# Altium PCB SOM_PCB_BLUETECHNIX.PcbDoc (part 4 of 8)
Units mil, origin at the board's own origin, x right, y up, seen from the top; angles counter-clockwise.
Board outline 1225 x 1620 mil, 8 copper layers (Top Layer, Int1 (Sign), Int2 (GND), Int3 (Sign), Int4 (Sign), Int5 (PWR), Int6 (Sign), Bottom Layer), stack 66.2 mil thick; 65 components, 201 nets, 938 pads, 497 vias.
Unrouted connection lines stored in the file: 25.
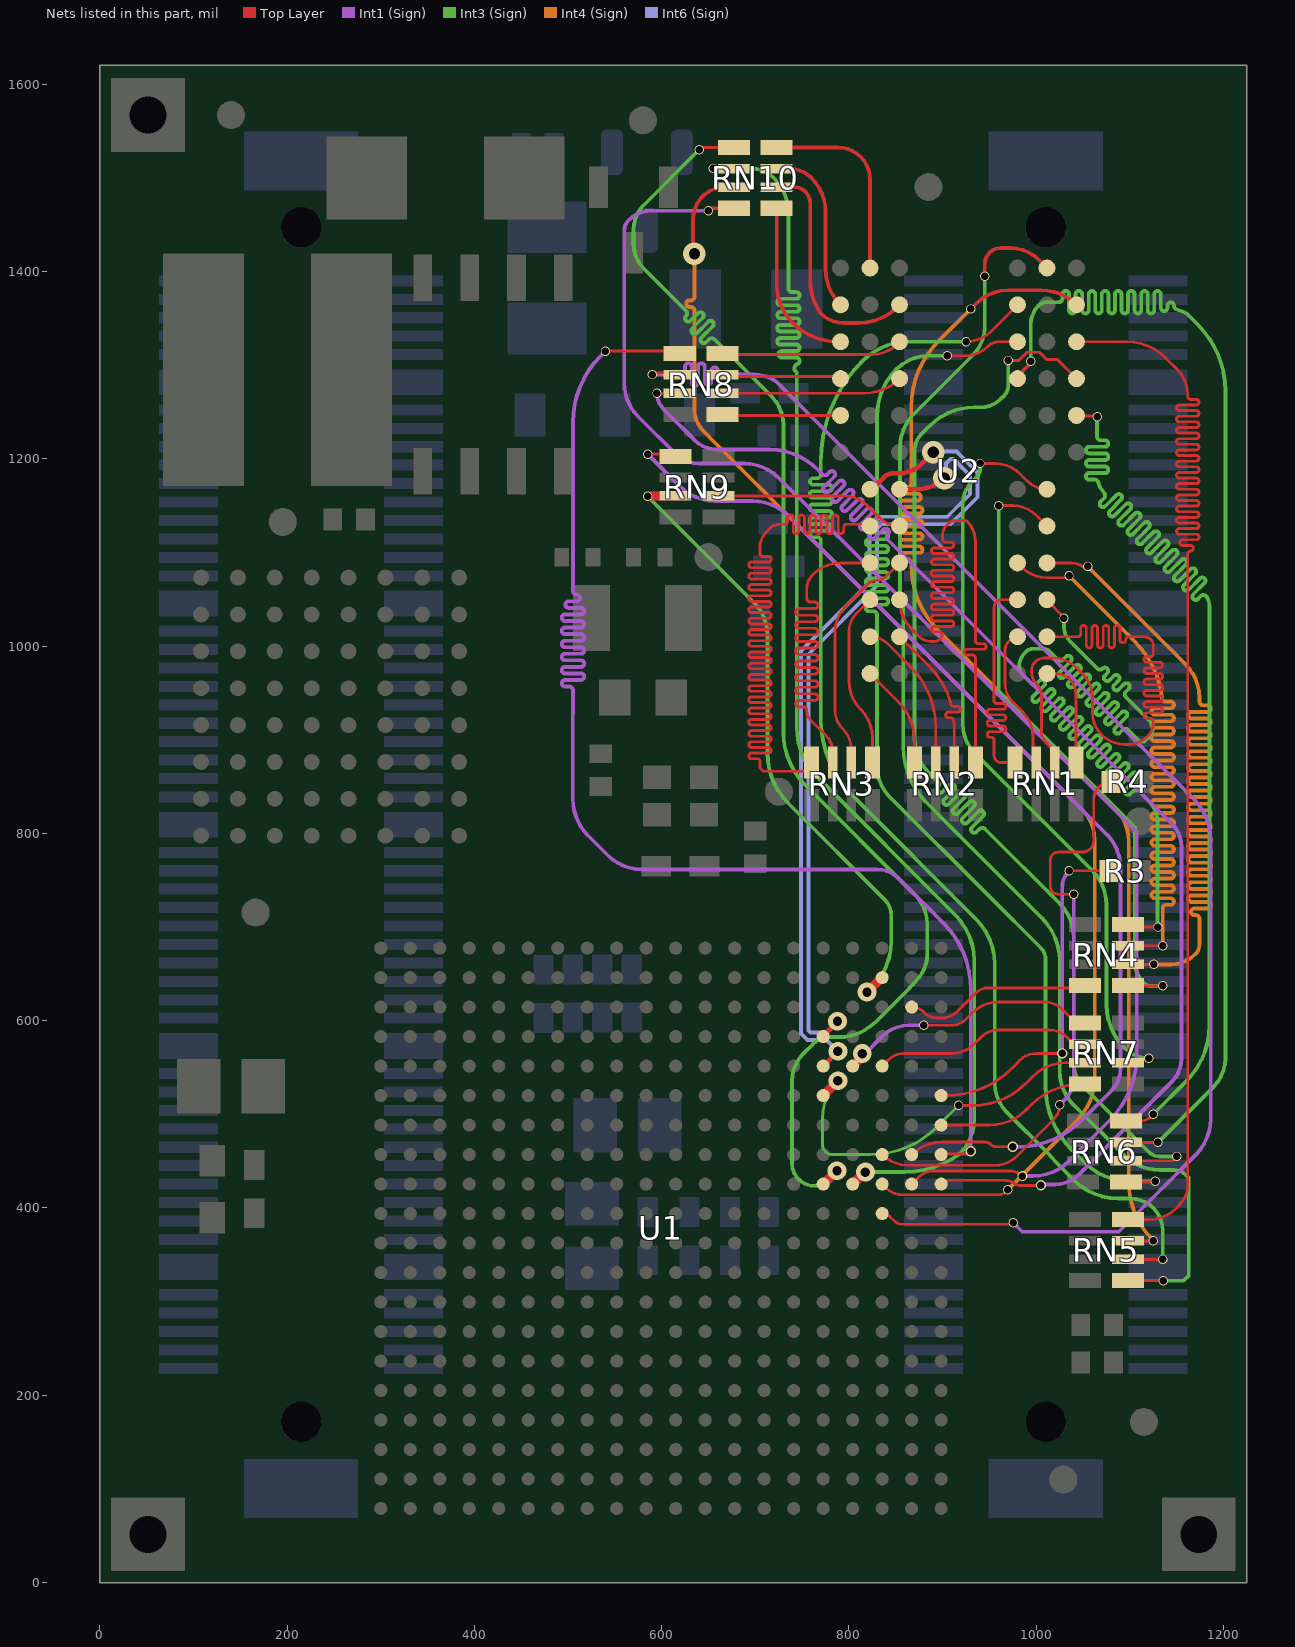
[diagram p9: the nets of this part, all layers, seen from the top]

## Via types
v1: diameter 20, hole 10, Top Layer to Int2 (GND), tented both sides, 68 vias
v2: diameter 10, hole 8, Top Layer to Int3 (Sign), tented both sides, 53 vias
v3: diameter 20, hole 10, Top Layer to Bottom Layer, tented both sides, 44 vias
v4: diameter 10, hole 8, Top Layer to Int1 (Sign), tented both sides, 41 vias
v5: diameter 20, hole 10, Top Layer to Int5 (PWR), tented both sides, 40 vias
v6: diameter 10, hole 8, Top Layer to Int4 (Sign), tented both sides, 33 vias
v7: diameter 20, hole 10, Top Layer to Int3 (Sign), tented both sides, 25 vias
v8: diameter 24, hole 12, Int6 (Sign) to Bottom Layer, tented both sides, 22 vias
v9: diameter 20, hole 10, Top Layer to Int4 (Sign), tented both sides, 19 vias
v10: diameter 24, hole 12, Int4 (Sign) to Bottom Layer, tented both sides, 17 vias
v11: diameter 24, hole 12, Int2 (GND) to Bottom Layer, tented both sides, 15 vias
v12: diameter 20, hole 10, Top Layer to Int1 (Sign), tented both sides, 13 vias
v13: diameter 24, hole 12, Top Layer to Int6 (Sign), tented both sides, 11 vias
v14: diameter 24, hole 12, Top Layer to Int4 (Sign), tented both sides, 10 vias
v15: diameter 24, hole 12, Top Layer to Int3 (Sign), tented both sides, 8 vias
v16: diameter 11, hole 8, Top Layer to Int1 (Sign), tented both sides, 8 vias
v17: diameter 10, hole 8, Top Layer to Bottom Layer, tented both sides, 7 vias
v18: diameter 20, hole 10, Top Layer to Int6 (Sign), tented both sides, 7 vias
v19: diameter 10, hole 8, Top Layer to Int6 (Sign), tented both sides, 6 vias
v20: diameter 10, hole 8, Int4 (Sign) to Bottom Layer, tented both sides, 6 vias
v21: diameter 24, hole 12, Int1 (Sign) to Bottom Layer, tented both sides, 5 vias
v22: diameter 24, hole 12, Top Layer to Int2 (GND), tented both sides, 5 vias
v23: diameter 10, hole 7, Top Layer to Int1 (Sign), tented both sides, 4 vias
v24: diameter 10, hole 8, Top Layer to Int2 (GND), tented both sides, 4 vias
v25: diameter 10, hole 8, Int2 (GND) to Bottom Layer, tented both sides, 4 vias
v26: diameter 24, hole 12, Int3 (Sign) to Bottom Layer, tented both sides, 4 vias
v27: diameter 24, hole 12, Top Layer to Bottom Layer, tented both sides, 4 vias
v28: diameter 10, hole 8, Int5 (PWR) to Bottom Layer, tented both sides, 3 vias
v29: diameter 20, hole 10, Int2 (GND) to Bottom Layer, tented both sides, 2 vias
v30: diameter 10, hole 8, Int6 (Sign) to Bottom Layer, tented both sides, 2 vias
v31: diameter 10, hole 8, Top Layer to Bottom Layer, 1 vias
v32: diameter 22, hole 12, Int2 (GND) to Bottom Layer, tented both sides, 1 vias
v33: diameter 24, hole 10, Int2 (GND) to Bottom Layer, tented both sides, 1 vias
v34: diameter 20, hole 12, Top Layer to Int5 (PWR), tented both sides, 1 vias
v35: diameter 20, hole 12, Top Layer to Int2 (GND), tented both sides, 1 vias
v36: diameter 24, hole 12, Top Layer to Int5 (PWR), tented both sides, 1 vias
v37: diameter 24, hole 12, Top Layer to Int1 (Sign), tented both sides, 1 vias

## Nets (pads, with @x,y where several pads share a name; then routed paths per layer and width w, separated by ;. In a path a pad name is that pad's centre, name@x,y a point inside that pad or via, vN(x,y) a via of type N, cw(c..) or ccw(c..) an arc to the next point about the centre after c; other vN are vias at no path point) (continued)
DDR_D9: RN8.3 U1.J20 | length 1586
  Top Layer w3: v4(595,1270) RN8.3@619.33,1270 ; U1.J20@898.46,425.51 cw(c908.09,415.88) 908.09,429.5 966.26,429.5 cw(c966.26,410.97) 978.28,425.08 ; 976.45,426.45 ccw(c982.18,432.18) 978.28,425.08 ; v16(1005,424.07) 982.18,424.07 cw(c982.18,432.18) 978.28,425.08
  Int1 (Sign) w4: v4(595,1270) ccw(c619.14,1270) 602.07,1252.93 635,1220 ccw(c659.14,1244.14) 654.71,1210.29 ccw(c659.14,1244.14) 659.14,1210 715,1210 cw(c715,1137.57) 733,1207.73 cw(c715,1137.57) 766.21,1188.79 770,1185 771.41,1183.59 ccw(c774.24,1186.41) 777.07,1183.59 779.32,1185.83 cw(c781.79,1183.36) 784.27,1185.83 cw(c781.79,1183.36) 784.27,1180.88 773.18,1169.8 ccw(c775.66,1167.32) 773.18,1164.85 ccw(c775.66,1167.32) 778.13,1164.85 789.22,1175.93 cw(c791.69,1173.46) 794.17,1175.93 cw(c791.69,1173.46) 794.17,1170.98 783.08,1159.9 ccw(c785.56,1157.42) 783.08,1154.95 ccw(c785.56,1157.42) 788.03,1154.95 799.12,1166.03 cw(c801.59,1163.56) 804.07,1166.03 cw(c801.59,1163.56) 804.07,1161.08 792.98,1150 ccw(c795.46,1147.52) 792.98,1145.05 ccw(c795.46,1147.52) 797.93,1145.05 809.02,1156.13 cw(c811.49,1153.66) 813.97,1156.13 cw(c811.49,1153.66) 813.97,1151.18 802.88,1140.1 ccw(c805.36,1137.62) 802.88,1135.15 ccw(c805.36,1137.62) 807.83,1135.15 818.92,1146.23 cw(c821.39,1143.76) 823.87,1146.23 cw(c821.39,1143.76) 823.87,1141.28 812.78,1130.2 ccw(c815.26,1127.72) 812.78,1125.25 ccw(c815.26,1127.72) 817.73,1125.25 828.82,1136.33 cw(c831.29,1133.86) 833.77,1136.33 cw(c831.29,1133.86) 833.77,1131.38 822.68,1120.3 ccw(c825.15,1117.82) 822.68,1115.35 ccw(c825.15,1117.82) 827.63,1115.35 836.68,1124.4 cw(c839.15,1121.92) 841.63,1124.4 cw(c839.15,1121.92) 841.63,1119.45 841.42,1119.24 ccw(c844.25,1116.41) 841.42,1113.58 850,1105 1145.31,809.69 cw(c1121.92,786.3) 1155,786.3 1155,772.6 1155,559.14 cw(c1120.86,559.14) 1145.02,535.02 1045.61,435.61 cw(c1020,461.21) 1020,425 1007.56,425 v16(1005,424.07)
DDR_D10: RN8.2 U1.K18 | length 1647.3
  Top Layer w3: v4@593.61,1291.72 617.3,1291.72 RN8.2@619.33,1289.68 ; U1.K18@835.47,394.02 cw(c835.47,381.94) 842.28,391.91 cw(c835.47,381.94) 844.01,390.48 847.99,386.5 ccw(c857.6,396.11) 857.6,382.52 973.38,382.52 974.36,382.95 v4(975.62,384.02)
  Int1 (Sign) w4: v4(590,1290) 611.72,1290 619.02,1290 621.02,1290 ccw(c621.02,1294) 625.02,1294 625.02,1298.5 cw(c628.52,1298.5) 632.02,1298.5 632.02,1281.5 ccw(c635.52,1281.5) 639.02,1281.5 639.02,1298.5 cw(c642.52,1298.5) 646.02,1298.5 646.02,1282.56 ccw(c649.52,1282.56) 653.02,1282.56 653.02,1294 cw(c656.52,1294) 660.02,1294 ccw(c664.02,1294) 664.02,1290 678.65,1290 680.65,1290 699.15,1290 cw(c699.14,1251.72) 708.87,1288.74 cw(c699.14,1251.72) 715,1286.56 cw(c699.14,1251.72) 726.18,1278.82 1167.93,837.07 cw(c1123.63,792.77) 1186.28,792.77 1186.28,495 cw(c1132.73,495) 1170.6,457.14 1129.23,415.77 ; v4(975.62,384.02) 985.08,374.56 1088.02,374.56 1129.21,415.75
DDR_D11: RN8.1 U1.H20 | length 1585.1
  Top Layer w3: v4(540,1315) 616.65,1315 RN8.1@619.33,1312.32 ; U1.H20@898.46,457.01 899.21,457.75 927.75,457.75 930,460 v16(930,460.5)
  Int1 (Sign) w4: 521.57,797.51 cw(c561.64,837.54) 505,837.54 505,928.18 505.31,928.49 505.31,950.78 505.31,952.78 ccw(c501.31,952.78) 501.31,956.78 496.81,956.78 cw(c496.81,960.28) 496.81,963.78 513.81,963.78 ccw(c513.81,967.28) 513.81,970.78 496.81,970.78 cw(c496.81,974.28) 496.81,977.78 513.81,977.78 ccw(c513.81,981.28) 513.81,984.78 496.81,984.78 cw(c496.81,988.28) 496.81,991.78 513.81,991.78 ccw(c513.81,995.28) 513.81,998.78 496.81,998.78 cw(c496.81,1002.28) 496.81,1005.78 513.81,1005.78 ccw(c513.81,1009.28) 513.81,1012.78 496.81,1012.78 cw(c496.81,1016.28) 496.81,1019.78 513.81,1019.78 ccw(c513.81,1023.28) 513.81,1026.78 496.81,1026.78 cw(c496.81,1030.28) 496.81,1033.78 513.81,1033.78 ccw(c513.81,1037.28) 513.81,1040.78 500.8,1040.78 cw(c500.8,1044.28) 500.8,1047.78 509.32,1047.78 ccw(c509.32,1051.28) 509.32,1054.78 cw(c509.31,1058.78) 505.31,1058.78 505.31,1073.31 505.31,1238.89 cw(c605.31,1238.89) 534.6,1309.6 v4(540,1315) ; 521.59,797.48 542.43,776.65 ccw(c578.99,813.21) 578.99,761.5 830.18,761.5 cw(c830.18,729.35) 852.92,752.08 900.71,704.29 cw(c830,633.58) 930,633.58 v16(930,460.5)
DDR_D12: RN10.4 U1.J19 | length 1592.4
  Top Layer w3: U1.J19@866.97,425.51 873.97,432.51 cw(c890.86,415.62) 890.86,439.51 958.93,439.51 971.72,439.5 cw(c971.72,420.72) 984.33,434.64 v16(985.24,434.07)
  Top Layer w4: 654.41,1467.52 RN10.4@677.17,1467.52
  Int1 (Sign) w4: v4(650,1465) 589.35,1465 ccw(c589.35,1430.35) 564.85,1454.85 ccw(c576.56,1443.14) 560,1443.14 560,1281.21 ccw(c611.21,1281.21) 574.99,1245.01 615,1205 ccw(c639.14,1229.14) 639.14,1195 687.83,1195 cw(c687.83,1142.46) 724.97,1179.63 725.02,1179.58 1067.48,841.42 1107.21,801.69 1107.21,558.78 cw(c1007.33,563.76) 1078.05,493.05 1035,450 cw(c996.37,488.63) 996.37,434 v16(985.24,434.07)
DDR_D13: RN10.3 U1.J18 | length 1460.3
  Top Layer w3: RN10.3@667.95,1490.16 RN10.3@677.17,1490.16 ; U1.J18@835.47,425.51 U1.J18@839.79,421.19 ; U1.J18@839.82,421.16 ccw(c856.9,438.26) 856.9,414.09 862.13,414.09 862.2,414.01 871.73,414.01 871.81,414.09 893.62,414.09 893.7,414.01 959.43,414.01 ccw(c959.43,425.07) 962.68,414.5 ccw(c959.43,425.07) 967.24,417.24 v6(969.72,419.31)
  Top Layer w4: v14(635,1419.06) 633.59,1420.47 633.59,1451.41 633.59,1455.83 cw(c667.92,1455.82) RN10.3@667.91,1490.16
  Int4 (Sign) w4: v14(635,1419.06) 635,1387.49 635,1373.11 cw(c631,1373.11) 631,1369.11 629.67,1369.11 ccw(c629.67,1365.61) 629.67,1362.11 631,1362.11 cw(c631,1358.11) 635,1358.11 635,1356.11 635,1253.18 ccw(c668.56,1253.18) 644.81,1229.47 ; 644.83,1229.45 1048.87,825.41 cw(c1015.96,792.5) 1062.5,792.5 1062.5,539.4 cw(c997.55,539.4) 1043.48,493.48 970.85,420.85 v6(969.72,419.31)
DDR_D14: RN10.2 U1.J17 | length 1555.7
  Top Layer w3: v2(655,1510) 677.01,1510 RN10.2@677.17,1509.84
  Top Layer w10: U1.J17@803.98,425.51 804.38,425.51 817.17,438.3 v7(817.57,438.3)
  Int3 (Sign) w4: v2(655,1510) 695.54,1510 cw(c695.54,1475.86) 719.68,1500 cw(c681.86,1462.18) 735.35,1462.18 735.35,1383.99 735.35,1381.99 ccw(c739.35,1381.99) 739.35,1377.99 743.85,1377.99 cw(c743.85,1374.49) 743.85,1370.99 726.85,1370.99 ccw(c726.85,1367.49) 726.85,1363.99 743.85,1363.99 cw(c743.85,1360.49) 743.85,1356.99 726.85,1356.99 ccw(c726.85,1353.49) 726.85,1349.99 743.85,1349.99 cw(c743.85,1346.49) 743.85,1342.99 726.85,1342.99 ccw(c726.85,1339.49) 726.85,1335.99 743.85,1335.99 cw(c743.85,1332.49) 743.85,1328.99 726.85,1328.99 ccw(c726.85,1325.49) 726.85,1321.99 743.85,1321.99 cw(c743.85,1318.49) 743.85,1314.99 728.26,1314.99 ccw(c728.26,1311.49) 728.26,1307.99 743.85,1307.99 cw(c743.85,1304.49) 743.85,1300.99 ccw(c747.74,1296.46) 742.3,1293.99 744.24,1292.05 744.24,1280.79 744.24,913.22 ccw(c819.45,913.22) 766.25,860.06 913.54,712.77 cw(c864.76,663.98) 933.75,663.98 933.75,494.84 cw(c881.3,494.84) 918.39,457.75 cw(c859.13,538.3) 859.13,438.3 v7(817.57,438.3)
DDR_D15: RN10.1 U1.J16 | length 1525.5
  Top Layer w3: v2(640,1530) 642.48,1532.48 RN10.1@677.17,1532.48
  Top Layer w10: U1.J16@772.48,425.51 772.72,425.51 786.97,439.76 v7(787.21,439.76)
  Int3 (Sign) w4: 580.76,1470.76 ccw(c606.82,1444.75) 570,1444.75 570,1429.5 ccw(c607.38,1429.5) 580.95,1403.07 608.4,1375.61 625.95,1358.06 cw(c623.13,1355.23) 625.95,1352.4 ccw(c628.43,1349.93) 625.95,1347.45 ccw(c628.43,1349.93) 630.9,1347.45 638.96,1355.51 cw(c641.43,1353.03) 643.91,1355.51 cw(c641.43,1353.03) 643.91,1350.56 632.67,1339.32 ccw(c635.15,1336.85) 632.67,1334.37 ccw(c635.15,1336.85) 637.62,1334.37 649.64,1346.39 cw(c652.12,1343.92) 654.59,1346.39 cw(c652.12,1343.92) 654.59,1341.44 642.57,1329.42 ccw(c645.05,1326.95) 642.57,1324.47 ccw(c645.05,1326.95) 647.52,1324.47 650.7,1327.66 cw(c653.53,1324.83) 656.36,1327.66 657.77,1326.24 717.28,1266.74 ; 580.78,1470.78 v2(640,1530) ; 717.3,1266.72 cw(c686.56,1236.02) 730,1236.02 730,907.74 ccw(c809.04,907.74) 753.11,851.89 ; 753.15,851.85 870.67,734.33 cw(c839.34,703) 883.65,703 883.65,671.33 cw(c843.43,671.33) 880.39,655.47 cw(c843.43,671.33) 871.87,642.89 cw(c793.57,705.1) 864.29,634.39 829.11,599.21 cw(c788.14,640.18) 795.14,582.67 780.35,582.67 ccw(c780.35,556.04) 761.52,574.87 751.05,564.4 ccw(c779.7,535.75) 739.19,535.75 739.19,447.41 ccw(c762.89,447.41) 746.06,430.71 746.1,430.67 ccw(c763.69,448.18) 759.4,423.74 762.11,423.74 ccw(c762.11,445.08) 777.2,429.99 ccw(c759.4,452.21) 779.52,432.06 ; 779.53,432.08 v7(787.21,439.76)
DDR_D\C\A\S\: RN7.3 U1.F16 | length 412.2
  Top Layer w3: v2(917,509.5) 932.82,509.5 ccw(c932.82,588.07) 988.37,532.51 996.31,540.45 cw(c1031.43,505.33) 1031.43,555 1052.01,555 RN7.3@1052.17,555.16
  Top Layer w10: U1.F16@772.48,520 v7(788.23,535.75)
  Int3 (Sign) w3: v7(788.23,535.75) ccw(c828.06,495.91) 771.73,495.91 771.73,467.96 ccw(c783.05,467.96) 775.04,459.96 ccw(c783.05,467.96) 780.35,456.97 823.05,456.97 ccw(c823.05,556.97) 893.76,486.26 v2(917,509.5)
DDR_D\C\L\K\E\: RN9.3 U1.B18 | length 691.4
  Top Layer w10: v2(585,1160) 585.31,1160.32 RN9.3@615,1160.32 ; v7(819.29,630.5) 819.64,630.5 835.12,645.98 U1.B18@835.47,645.98
  Int3 (Sign) w4: v2(585,1160) 698.68,1046.32 cw(c664.1,1011.74) 713.01,1011.74 713.01,885.74 ccw(c788.9,885.74) 735.24,832.07 838.4,728.91 cw(c822.26,712.77) 845.09,712.77 845.09,684.53 cw(c776.92,684.53) 825.12,636.34 v7(819.29,630.5)
DDR_D\C\S\0\: RN4.4 U1.C19 | length 201
  Top Layer w3: U1.C19@866.97,614.49 cw(c866.97,595.93) 875.27,612.53 cw(c866.97,595.93) 880.07,609.07 ; 880.09,609.05 881.42,607.72 ; 881.43,607.71 ccw(c892.85,619.14) 892.85,602.99 899.54,602.99 ccw(c899.54,625.46) 915.41,609.56 ; 915.43,609.57 935.43,629.57 ; 935.44,629.58 cw(c948.54,616.46) 948.54,635 1049.65,635 RN4.4@1052.17,637.52
DDR_D\R\A\S\: RN7.1 U1.E17 | length 269.5
  Top Layer w3: v4(880,595) 910,595 ccw(c910,614.75) 923.95,600.77 ; 923.96,600.78 931.28,608.11 cw(c960,579.39) 960,620 1008.71,620 cw(c1008.71,592.77) 1027.96,612.03 1035.94,604.05 1036.54,604.05 1040,600.6 RN7.1@1040,599.99
  Top Layer w10: U1.E17@803.98,551.5 814.09,561.61 v12(814.09,564.82)
  Int1 (Sign) w4: v12(814.09,564.82) 817.3,564.82 817.39,564.91 835.98,583.5 cw(c863.74,555.75) 863.74,595 v4(880,595)
DDR_D\W\R\: RN7.2 U1.E18 | length 234.3
  Top Layer w3: U1.E18@835.47,551.5 842.23,558.25 cw(c858.53,541.95) 858.53,565 910,565 ccw(c910,597.69) 933.09,574.55 940.82,582.29 ; 940.84,582.3 cw(c959.44,563.67) 959.44,590 1014.28,590 cw(c1014.28,564.12) 1032.56,582.44 ; 1032.58,582.42 1040.16,574.84 RN7.2@1052.17,574.84
DDR_DCLK0_N: U1.E16 U2.G3 | length 893.5
  Top Layer w5: U1.E16@772.48,551.5 v18(788.23,567.24) ; U2.G3@854.02,1167.52 872.96,1167.52 ccw(c872.96,1207.98) 878.67,1167.93 ccw(c872.96,1207.98) 901.57,1179.37 v13@907.39,1173.55
  Int6 (Sign) w4: v18(788.23,567.24) 788.04,567.24 776.04,579.24 755.76,579.24 748.73,586.27 748.73,994.62 822,1067.88 822,1128.61 831.39,1138 905,1138 929.17,1162.17 929.17,1182.06 911.51,1199.72 908.2,1199.72 903.52,1195.04 903.52,1181.33 v13(901.65,1179.46)
DDR_DCLK0_P: U1.D16 U2.G2 | length 911.8
  Top Layer w5: U1.D16@772.48,582.99 772.48,583.34 786.76,597.62 v18(787.84,599.24) ; U2.G2@822.52,1167.52 824.55,1167.52 836.98,1179.96 cw(c848.03,1168.91) 848.03,1184.53 854.5,1184.53 ccw(c854.5,1215.58) 876.45,1193.63 889.76,1206.93 v13(890.12,1206.93)
  Int6 (Sign) w4: v18(787.84,599.24) 787.84,599.05 776.04,587.24 759.08,587.24 756.73,589.59 756.73,991.3 830,1064.57 830,1125.29 834.71,1130 908.31,1130 937.17,1158.85 937.17,1185.37 914.83,1207.72 890.9,1207.72 v13(890.12,1206.93)
DDR_DQM0: RN7.4 U1.G20 | length 164.3
  Top Layer w3: U1.G20@898.46,488.5 908.36,488.5 ; 909.24,488.38 ccw(c908.38,485.5) 908.41,488.5 950.53,488.5 ccw(c950.53,542.53) 988.74,504.33 993.9,509.49 cw(c1049.4,453.99) 1026.15,528.96 cw(c1049.4,453.99) RN7.4@1049.4,532.48
DDR_DQM1: RN9.1 U1.H19 | length 1204.1
  Top Layer w3: v4(585,1205) 612.64,1205 RN9.1@615,1202.64 ; U1.H19@866.97,457.01 cw(c899.54,424.43) 899.54,470.5 944.78,470.5 cw(c944.78,461.11) 951.42,467.75 ccw(c957.02,473.35) 957.02,465.43 v16(975,465.43)
  Int1 (Sign) w4: v4(585,1205) 619.13,1170.87 ccw(c657.52,1209.27) 657.52,1154.97 696.42,1154.97 cw(c696.42,1099.72) 735.49,1138.79 1075.36,798.91 cw(c1040.03,763.58) 1090,763.58 1090,549.14 cw(c1055.86,549.14) 1080.02,525.02 1049.29,494.29 cw(c978.58,565) 1010.12,470.1 cw(c978.58,565) 978.58,465 978.15,465.43 v16(975,465.43)
DDR_DQS0: R3.1 U1.F20 | length 382.1
  Top Layer w3: U1.F20@898.46,520 903.61,520 ccw(c903.61,620) 922.74,521.85 ccw(c903.61,620) 974.32,549.29 980,554.96 cw(c1000.14,539.92) 982.36,557.69 cw(c1000,540.06) 1000,565 v16(1027.74,565) ; v4(1035,760) R3.1@1077.48,760
  Int1 (Sign) w4: v16(1027.74,565) 1027.74,742.48 cw(c1052.52,742.48) v4(1035,760)
DDR_DQS1: R4.1 U1.H18 | length 641.6
  Top Layer w3: U1.H18@835.47,457.01 ccw(c863.24,484.77) 862.19,445.52 ccw(c863.24,484.77) 863.24,445.51 955.62,445.51 ccw(c955.62,479.38) 979.57,455.43 1018.54,494.39 ccw(c1002.93,510) v4(1025,510) ; v4(1040,735) 1023.54,735 cw(c1023.54,743.54) 1017.51,737.49 cw(c1023.54,743.54) 1015,743.54 1015,771.46 cw(c1023.54,771.46) 1017.49,777.49 cw(c1023.54,771.46) 1023.54,780 1049.4,780 ccw(c1049.4,791.97) 1061.37,791.97 1061.37,836.41 cw(c1079.96,836.41) R4.1@1079.96,855
  Int1 (Sign) w4: v4(1025,510) 1030.25,515.25 ccw(c1006.71,538.79) 1040,538.79 v4(1040,735)
DDR_RES_A0: RN1.8 U2.K7 | length 316.7
  Top Layer w3: 957.15,877.85 cw(c962.39,883.06) 955,883.06 955,898.09 955,899.59 ccw(c952,899.59) 952,902.59 950.6,902.59 cw(c950.6,905.59) 950.6,908.59 964.6,908.59 ccw(c964.6,911.59) 964.6,914.59 950.6,914.59 cw(c950.6,917.59) 950.6,920.59 964.6,920.59 ccw(c964.6,923.59) 964.6,926.59 950.6,926.59 cw(c950.6,929.59) 950.6,932.59 964.6,932.59 ccw(c964.6,935.59) 964.6,938.59 958,938.59 cw(c958,941.59) 955,941.59 955,946.28 955,1041.88 cw(c962.53,1041.88) 957.2,1047.2 cw(c962.53,1041.88) 962.53,1049.41 U2.K7@980,1049.41 ; 957.18,877.82 ccw(c962.39,883.06) 962.39,875.67 RN1.8@977.36,875.67
DDR_RES_A1: RN1.6 U2.L8 | length 861.4
  Top Layer w3: 998.92,983.19 ccw(c1008.43,973.71) 995,973.71 995,972.42 ccw(c1012.92,972.42) 1000.25,959.75 cw(c987.58,947.08) 1005.5,947.08 1005.5,909.92 ccw(c1024.95,909.92) 1011.19,896.17 cw(c990.7,875.67) RN1.6@1019.68,875.67 ; 998.94,983.22 cw(c1008.43,973.71) 1008.43,987.14 1017.86,987.14 cw(c1017.86,950.92) 1043.45,976.55 1049.09,970.91 cw(c1022.75,944.57) 1060,944.57 1060,929.14 ccw(c1094.14,929.14) 1069.98,905.02 ccw(c1094.14,929.14) 1094.14,895 1097.84,895 ccw(c1097.84,925.17) 1109.21,897.22 ccw(c1097.84,925.17) 1119.18,903.84 ccw(c1105.12,917.89) 1125,917.89 1125,918.2 1125,919.7 ccw(c1122,919.7) 1122,922.7 1118,922.7 cw(c1118,925.7) 1118,928.7 1132,928.7 ccw(c1132,931.7) 1132,934.7 1118,934.7 cw(c1118,937.7) 1118,940.7 1132,940.7 ccw(c1132,943.7) 1132,946.7 1118,946.7 cw(c1118,949.7) 1118,952.7 1132,952.7 ccw(c1132,955.7) 1132,958.7 1118,958.7 cw(c1118,961.7) 1118,964.7 1132,964.7 ccw(c1132,967.7) 1132,970.7 1118,970.7 cw(c1118,973.7) 1118,976.7 1132,976.7 ccw(c1132,979.7) 1132,982.7 1118,982.7 cw(c1118,985.7) 1118,988.7 1122,988.7 ccw(c1122,991.7) 1125,991.7 1125,996.51 1125,1000.75 ccw(c1116.01,1000.75) 1116.01,1009.74 ccw(c1113.4,998.44) 1113.4,1010.04 1112.8,1010.04 1098.49,1010.04 ccw(c1098.49,1007.04) 1095.49,1007.04 1095.49,1006.51 cw(c1092.49,1006.51) 1089.49,1006.51 1089.49,1019.04 ccw(c1086.49,1019.04) 1083.49,1019.04 1083.49,1001.04 cw(c1080.49,1001.04) 1077.49,1001.04 1077.49,1019.04 ccw(c1074.49,1019.04) 1071.49,1019.04 1071.49,1001.04 cw(c1068.49,1001.04) 1065.49,1001.04 1065.49,1019.04 ccw(c1062.49,1019.04) 1059.49,1019.04 1059.49,1001.04 cw(c1056.49,1001.04) 1053.49,1001.04 1053.49,1019.04 ccw(c1050.49,1019.04) 1047.49,1019.04 1047.49,1013.04 cw(c1044.49,1013.04) 1044.49,1010.04 1042.99,1010.04 U2.L8@1011.5,1010.04
DDR_RES_A2: RN1.7 U2.L7 | length 152.9
  Top Layer w3: U2.L7@980,1010.04 977.13,1007.17 972.98,1007.17 970.52,1004.71 ccw(c980.23,995) 966.5,995 966.5,960.52 ccw(c995.52,960.52) 975,940 985.69,929.31 cw(c959.88,903.5) 996.38,903.5 996.38,879.29 RN1.7@1000,875.67
DDR_RES_A3: RN1.5 U2.M8 | length 116.3
  Top Layer w3: U2.M8@1011.5,970.67 1020.14,970.67 cw(c1020.14,948.49) 1035.81,964.19 ; 1035.84,964.16 cw(c1020.14,948.49) 1042.32,948.49 RN1.5@1042.32,875.67
DDR_RES_A4: RN2.8 U2.M2 | length 112.2
  Top Layer w3: U2.M2@822.52,970.67 853.25,939.94 cw(c812.73,899.41) 870.04,899.41 RN2.8@870.04,875.67
DDR_RES_A5: RN2.6 U2.L3 | length 181.2
  Top Layer w3: U2.L3@854.02,1010.04 885.48,978.57 cw(c820.59,913.68) 908.51,940 cw(c820.59,913.68) 908.94,938.5 909.01,938.07 ccw(c911.97,938.5) 911.97,935.5 916.28,935.5 cw(c916.28,932.5) 916.28,929.5 906.25,929.5 ccw(c906.25,926.5) 906.25,923.5 908.54,923.5 cw(c908.54,920.5) 911.51,920.93 912.35,915.18 cw(c820.59,913.68) 912.36,913.68 RN2.6@912.36,875.67
DDR_RES_A6: RN2.7 U2.L2 | length 164.9
  Top Layer w3: U2.L2@822.52,1010.04 cw(c822.52,982.96) 833.4,1007.76 cw(c822.52,982.96) 841.67,1002.11 866.01,977.77 cw(c801.62,913.38) 892.68,913.38 RN2.7@892.68,875.67
DDR_RES_A7: RN2.5 U2.K3 | length 857.9
  Top Layer w3: U2.K3@854.02,1049.41 U2.K3@854.02,1049.41 ccw(c898.37,1049.36) 866.98,1018.02 874.7,1010.3 ccw(c887.5,1023.11) 887.5,1005 891.46,1005 ccw(c891.46,1013.54) 897.3,1007.3 ccw(c891.46,1013.54) 897.49,1007.49 ccw(c891.43,1013.55) 898.56,1008.8 899.35,1010.8 ccw(c896.55,1011.89) 896.55,1014.89 891,1014.89 cw(c891,1017.89) 891,1020.89 909,1020.89 ccw(c909,1023.89) 909,1026.89 891,1026.89 cw(c891,1029.89) 891,1032.89 909,1032.89 ccw(c909,1035.89) 909,1038.89 891,1038.89 cw(c891,1041.89) 891,1044.89 909,1044.89 ccw(c909,1047.89) 909,1050.89 891,1050.89 cw(c891,1053.89) 891,1056.89 909,1056.89 ccw(c909,1059.89) 909,1062.89 891,1062.89 cw(c891,1065.89) 891,1068.89 909,1068.89 ccw(c909,1071.89) 909,1074.89 891,1074.89 cw(c891,1077.89) 891,1080.89 909,1080.89 ccw(c909,1083.89) 909,1086.89 891,1086.89 cw(c891,1089.89) 891,1092.89 909,1092.89 ccw(c909,1095.89) 909,1098.89 891,1098.89 cw(c891,1101.89) 891,1104.89 909,1104.89 ccw(c909,1107.89) 909,1110.89 903,1110.89 cw(c903,1113.89) 900,1113.89 900,1115.39 900,1117.93 cw(c917.07,1117.93) 905,1130 cw(c914.7,1120.3) 914.7,1134.02 923.66,1134.02 cw(c923.66,1130.06) 926.46,1132.86 cw(c905.86,1112.25) 935,1112.25 935,1096 ; RN2.5@935,875.67 935,986.04 935,987.54 ccw(c932,987.54) 932,990.54 926,990.54 cw(c926,993.54) 926,996.54 943.51,996.54 ccw(c943.51,999.54) 943.51,1002.54 938,1002.54 cw(c938,1005.54) 935,1005.54 935,1012 935,1094.5 ; 935,1094.5 935,1096 ; 935,1094.5 935,1096
DDR_RES_A8: RN3.5 U2.K2 | length 188.5
  Top Layer w3: U2.K2@822.52,1049.41 808.41,1035.3 ccw(c828.7,1015) 800,1015 800,962.68 ccw(c842.68,962.68) 812.48,932.52 cw(c782.32,902.32) 825,902.32 RN3.5@825,875.67
DDR_RES_A9: RN3.6 U2.J3 | length 250.1
  Top Layer w3: 793.66,911.34 cw(c814.64,932.28) 785,932.28 785,1015 cw(c823.58,1015) 796.29,1042.28 820.51,1066.49 cw(c830.08,1056.91) 830.08,1070.46 ccw(c830.08,1084) 839.65,1074.41 U2.J3@854.02,1088.78 ; 793.68,911.32 cw(c772.72,890.36) 802.36,890.36 RN3.6@802.36,875.67
DDR_RES_A10: RN4.8 U2.K8 | length 1559.4
  Top Layer w3: U2.K8@1011.5,1049.41 1011.5,1048.96 1028.76,1031.7 v2(1029.63,1029.66) ; RN4.8@1097.83,702.48 1100.31,700 v2(1130,700)
  Int3 (Sign) w4: 989.92,994.74 987.59,992.41 ccw(c1001.34,978.66) 981.89,978.66 981.89,977.51 ccw(c992.96,977.51) 985.13,969.69 988.38,966.44 994.88,959.94 ccw(c997.71,962.77) 1000.54,959.94 1003.72,963.12 cw(c1006.19,960.65) 1008.67,963.12 cw(c1006.19,960.65) 1008.67,958.17 996.65,946.15 ccw(c999.12,943.68) 996.65,941.2 ccw(c999.12,943.68) 1001.6,941.2 1013.62,953.22 cw(c1016.09,950.75) 1018.57,953.22 cw(c1016.09,950.75) 1018.57,948.27 1006.55,936.25 ccw(c1009.02,933.78) 1006.55,931.3 ccw(c1009.02,933.78) 1011.5,931.3 1023.52,943.33 cw(c1025.99,940.85) 1028.47,943.33 cw(c1025.99,940.85) 1028.47,938.38 1016.45,926.35 ccw(c1018.92,923.88) 1016.45,921.4 ccw(c1018.92,923.88) 1021.4,921.4 1033.42,933.43 cw(c1035.89,930.95) 1038.37,933.43 cw(c1035.89,930.95) 1038.37,928.48 1026.35,916.46 ccw(c1028.82,913.98) 1026.35,911.51 ccw(c1028.82,913.98) 1031.3,911.51 1043.32,923.53 cw(c1045.79,921.05) 1048.27,923.53 cw(c1045.79,921.05) 1048.27,918.58 1036.25,906.56 ccw(c1038.72,904.08) 1036.25,901.61 ccw(c1038.72,904.08) 1041.2,901.61 1053.22,913.63 cw(c1055.69,911.15) 1058.17,913.63 cw(c1055.69,911.15) 1058.17,908.68 1046.15,896.66 ccw(c1048.62,894.18) 1046.15,891.71 ccw(c1048.62,894.18) 1051.1,891.71 1063.12,903.73 cw(c1065.59,901.25) 1068.07,903.73 cw(c1065.59,901.25) 1068.07,898.78 1056.04,886.76 ccw(c1058.52,884.28) 1056.04,881.81 ccw(c1058.52,884.28) 1060.99,881.81 1073.02,893.83 cw(c1075.49,891.35) 1077.97,893.83 cw(c1075.49,891.35) 1077.97,888.88 1065.94,876.86 ccw(c1068.42,874.38) 1065.94,871.91 ccw(c1068.42,874.38) 1070.89,871.91 1082.91,883.93 cw(c1085.39,881.45) 1087.86,883.93 cw(c1085.39,881.45) 1087.86,878.98 1075.84,866.96 ccw(c1078.32,864.48) 1075.84,862.01 ccw(c1078.32,864.48) 1080.79,862.01 1092.81,874.03 cw(c1095.29,871.55) 1097.76,874.03 cw(c1095.29,871.55) 1097.76,869.08 1085.74,857.06 ccw(c1088.22,854.58) 1085.74,852.11 ccw(c1088.22,854.58) 1090.69,852.11 1102.71,864.13 cw(c1105.19,861.65) 1107.66,864.13 cw(c1105.19,861.65) 1107.66,859.18 1095.64,847.16 ccw(c1098.12,844.68) 1095.64,842.21 ccw(c1098.12,844.68) 1100.59,842.21 1103.77,845.39 cw(c1106.6,842.56) 1109.43,845.39 1110.85,843.98 1119.93,834.89 cw(c1096.84,811.79) 1129.5,811.79 1129.5,700.5 v2(1130,700) ; 989.93,994.75 cw(c995.54,989.12) 995.54,997.07 1007.93,997.07 cw(c1007.93,988.46) 1014.02,994.55 1021.63,986.94 1023.04,985.53 ccw(c1025.87,988.35) 1028.7,985.53 1031.88,988.71 cw(c1034.36,986.23) 1036.83,988.71 cw(c1034.36,986.23) 1036.83,983.76 1024.81,971.74 ccw(c1027.29,969.26) 1024.81,966.79 ccw(c1027.29,969.26) 1029.76,966.79 1041.78,978.81 cw(c1044.26,976.33) 1046.73,978.81 cw(c1044.26,976.33) 1046.73,973.86 1034.71,961.84 ccw(c1037.19,959.36) 1034.71,956.89 ccw(c1037.19,959.36) 1039.66,956.89 1051.68,968.91 cw(c1054.16,966.43) 1056.63,968.91 cw(c1054.16,966.43) 1056.63,963.96 1044.61,951.94 ccw(c1047.09,949.46) 1044.61,946.99 ccw(c1047.09,949.46) 1049.56,946.99 1061.58,959.01 cw(c1064.06,956.53) 1066.53,959.01 cw(c1064.06,956.53) 1066.53,954.06 1054.51,942.04 ccw(c1056.98,939.56) 1054.51,937.09 ccw(c1056.98,939.56) 1059.46,937.09 1071.48,949.11 cw(c1073.96,946.63) 1076.43,949.11 cw(c1073.96,946.63) 1076.43,944.16 1064.41,932.14 ccw(c1066.88,929.66) 1064.41,927.19 ccw(c1066.88,929.66) 1069.36,927.19 1081.38,939.21 cw(c1083.85,936.73) 1086.33,939.21 cw(c1083.85,936.73) 1086.33,934.26 1074.31,922.24 ccw(c1076.78,919.76) 1074.31,917.29 ccw(c1076.78,919.76) 1079.26,917.29 1091.28,929.31 cw(c1093.75,926.84) 1096.23,929.31 cw(c1093.75,926.84) 1096.23,924.36 1084.21,912.34 ccw(c1086.68,909.86) 1084.21,907.39 ccw(c1086.68,909.86) 1089.16,907.39 1092.34,910.57 cw(c1095.17,907.74) 1098,910.57 1103.92,904.65 1110.69,897.87 1115.32,897.87 1120,902.56 ; v2(1029.63,1029.66) 1029.63,1020.62 ccw(c1051.46,1020.62) 1036.03,1005.19 1048.62,992.59 1065.24,975.97 ccw(c1068.07,978.8) 1070.9,975.97 ; 1070.9,975.98 cw(c1073.37,973.5) 1075.85,975.98 cw(c1073.37,973.5) 1075.85,971.03 1073.31,968.49 ccw(c1075.79,966.02) 1073.31,963.54 ccw(c1075.79,966.02) 1078.26,963.54 1082.87,968.15 cw(c1085.34,965.67) 1087.82,968.15 cw(c1085.34,965.67) 1087.82,963.2 1083.21,958.59 ccw(c1085.69,956.12) 1083.21,953.64 ccw(c1085.69,956.12) 1088.16,953.64 1093.88,959.36 cw(c1096.35,956.88) 1098.83,959.36 cw(c1096.35,956.88) 1098.83,954.41 1095.64,951.23 ccw(c1098.47,948.4) 1095.64,945.57 1102.01,939.2 1122.08,919.14 cw(c1116.29,913.35) 1124.47,913.35 cw(c1109.22,913.35) 1120.02,902.58
DDR_RES_A11: RN3.7 U2.J2 | length 613.9
  Top Layer w3: 755,1065 755,1060.75 ; 758.52,921.48 cw(c767.07,930) 755,930 755,931.5 ccw(c751.5,931.5) 751.5,935 746.5,935 cw(c746.5,938.5) 746.5,942 763.5,942 ccw(c763.5,945.5) 763.5,949 746.5,949 cw(c746.5,952.5) 746.5,956 763.5,956 ccw(c763.5,959.5) 763.5,963 746.5,963 cw(c746.5,966.5) 746.5,970 763.5,970 ccw(c763.5,973.5) 763.5,977 746.5,977 cw(c746.5,980.5) 746.5,984 763.5,984 ccw(c763.5,987.5) 763.5,991 746.5,991 cw(c746.5,994.5) 746.5,998 763.5,998 ccw(c763.5,1001.5) 763.5,1005 746.5,1005 cw(c746.5,1008.5) 746.5,1012 763.5,1012 ccw(c763.5,1015.5) 763.5,1019 746.5,1019 cw(c746.5,1022.5) 746.5,1026 763.5,1026 ccw(c763.5,1029.5) 763.5,1033 746.5,1033 cw(c746.5,1036.5) 746.5,1040 763.5,1040 ccw(c763.5,1043.5) 763.5,1047 758.5,1047 cw(c758.5,1050.5) 755,1050.5 755,1059.69 755,1060.75 ; 758.54,921.46 775.02,904.98 cw(c756.54,886.5) 782.68,886.5 RN3.7@782.68,875.67 ; U2.J2@822.52,1088.78 791.09,1088.78 ccw(c791.09,1046.99) 761.54,1076.54 ccw(c777.33,1060.75) 757.36,1070.74 ccw(c777.33,1060.75) 755,1060.75
DDR_RES_A12: RN3.8 U2.H2 | length 1369.7
  Top Layer w3: 705,1109.75 705,1105.11 ; 716.46,1126.46 711.99,1121.99 ccw(c728.87,1105.11) 705,1105.11 ; 716.48,1126.48 cw(c725,1117.93) 725,1130 730,1130 731.5,1130 ccw(c731.5,1133) 734.5,1133 734.5,1137 cw(c737.5,1137) 740.5,1137 740.5,1123 ccw(c743.5,1123) 746.5,1123 746.5,1137 cw(c749.5,1137) 752.5,1137 752.5,1123 ccw(c755.5,1123) 758.5,1123 758.5,1137 cw(c761.5,1137) 764.5,1137 764.5,1123 ccw(c767.5,1123) 770.5,1123 770.5,1137 cw(c773.5,1137) 776.5,1137 776.5,1123 ccw(c779.5,1123) 782.5,1123 782.5,1137 cw(c785.5,1137) 788.5,1137 788.5,1123 ccw(c791.5,1123) 794.5,1123 794.5,1127 cw(c797.5,1127) 797.5,1130 811.04,1130 820.67,1130 U2.H2@822.52,1128.15 ; RN3.8@760.04,866.61 759.67,866.24 708.76,866.24 705,870 705,875.23 705,876.74 ccw(c702,876.74) 702,879.74 696,879.74 cw(c696,882.74) 696,885.74 714,885.74 ccw(c714,888.74) 714,891.74 696,891.74 cw(c696,894.74) 696,897.74 714,897.74 ccw(c714,900.74) 714,903.74 696,903.74 cw(c696,906.74) 696,909.74 714,909.74 ccw(c714,912.74) 714,915.74 696,915.74 cw(c696,918.74) 696,921.74 714,921.74 ccw(c714,924.74) 714,927.74 696,927.74 cw(c696,930.74) 696,933.74 714,933.74 ccw(c714,936.74) 714,939.74 696,939.74 cw(c696,942.74) 696,945.74 714,945.74 ccw(c714,948.74) 714,951.74 696,951.74 cw(c696,954.74) 696,957.74 714,957.74 ccw(c714,960.74) 714,963.74 696,963.74 cw(c696,966.74) 696,969.74 714,969.74 ccw(c714,972.74) 714,975.74 696,975.74 cw(c696,978.74) 696,981.74 714,981.74 ccw(c714,984.74) 714,987.74 696,987.74 cw(c696,990.74) 696,993.74 714,993.74 ccw(c714,996.74) 714,999.74 696,999.74 cw(c696,1002.74) 696,1005.74 714,1005.74 ccw(c714,1008.74) 714,1011.74 696,1011.74 cw(c696,1014.74) 696,1017.74 714,1017.74 ccw(c714,1020.74) 714,1023.74 696,1023.74 cw(c696,1026.74) 696,1029.74 714,1029.74 ccw(c714,1032.74) 714,1035.74 696,1035.74 cw(c696,1038.74) 696,1041.74 714,1041.74 ccw(c714,1044.74) 714,1047.74 696,1047.74 cw(c696,1050.74) 696,1053.74 714,1053.74 ccw(c714,1056.74) 714,1059.74 696,1059.74 cw(c696,1062.74) 696,1065.74 714,1065.74 ccw(c714,1068.74) 714,1071.74 696,1071.74 cw(c696,1074.74) 696,1077.74 714,1077.74 ccw(c714,1080.74) 714,1083.74 696,1083.74 cw(c696,1086.74) 696,1089.74 714,1089.74 ccw(c714,1092.74) 714,1095.74 708,1095.74 cw(c708,1098.74) 705,1098.74 705,1104.21 705,1105.11
DDR_RES_BA0: RN4.6 U2.J8 | length 1246.2
  Top Layer w3: U2.J8@1011.5,1088.78 1037.34,1088.78 cw(c1037.34,1067.34) 1052.5,1082.5 v6(1055,1085) ; RN4.6@1097.83,660.16 1097.98,660.02 1125.09,660.02 v6(1125.55,660.05)
  Int4 (Sign) w4: v6(1055,1085) 1159.44,980.56 cw(c1123.58,944.7) 1174.29,944.7 1174.29,942.7 1174.29,940.7 ccw(c1178.29,940.7) 1178.29,936.7 1182.79,936.7 cw(c1182.79,933.2) 1182.79,929.7 1165.79,929.7 ccw(c1165.79,926.2) 1165.79,922.7 1182.79,922.7 cw(c1182.79,919.2) 1182.79,915.7 1165.79,915.7 ccw(c1165.79,912.2) 1165.79,908.7 1182.79,908.7 cw(c1182.79,905.2) 1182.79,901.7 1165.79,901.7 ccw(c1165.79,898.2) 1165.79,894.7 1182.79,894.7 cw(c1182.79,891.2) 1182.79,887.7 1165.79,887.7 ccw(c1165.79,884.2) 1165.79,880.7 1182.79,880.7 cw(c1182.79,877.2) 1182.79,873.7 1165.79,873.7 ccw(c1165.79,870.2) 1165.79,866.7 1182.79,866.7 cw(c1182.79,863.2) 1182.79,859.7 1165.79,859.7 ccw(c1165.79,856.2) 1165.79,852.7 1182.79,852.7 cw(c1182.79,849.2) 1182.79,845.7 1165.79,845.7 ccw(c1165.79,842.2) 1165.79,838.7 1182.79,838.7 cw(c1182.79,835.2) 1182.79,831.7 1165.79,831.7 ccw(c1165.79,828.2) 1165.79,824.7 1182.79,824.7 cw(c1182.79,821.2) 1182.79,817.7 1165.79,817.7 ccw(c1165.79,814.2) 1165.79,810.7 1182.79,810.7 cw(c1182.79,807.2) 1182.79,803.7 1165.79,803.7 ccw(c1165.79,800.2) 1165.79,796.7 1182.79,796.7 cw(c1182.79,793.2) 1182.79,789.7 1165.79,789.7 ccw(c1165.79,786.2) 1165.79,782.7 1182.79,782.7 cw(c1182.79,779.2) 1182.79,775.7 1165.79,775.7 ccw(c1165.79,772.2) 1165.79,768.7 1182.79,768.7 cw(c1182.79,765.2) 1182.79,761.7 1165.79,761.7 ccw(c1165.79,758.2) 1165.79,754.7 1182.79,754.7 cw(c1182.79,751.2) 1182.79,747.7 1165.79,747.7 ccw(c1165.79,744.2) 1165.79,740.7 1182.79,740.7 cw(c1182.79,737.2) 1182.79,733.7 1165.79,733.7 ccw(c1165.79,730.2) 1165.79,726.7 1182.79,726.7 cw(c1182.79,723.2) 1182.79,719.7 1168.79,719.7 ccw(c1168.79,716.2) 1168.79,712.7 1170.29,712.7 cw(c1170.29,708.7) 1174.29,708.7 1174.29,695.45 1174.29,681.31 cw(c1159.64,681.31) 1170,670.95 cw(c1143.68,697.27) 1143.68,660.05 v6(1125.55,660.05)
DDR_RES_BA1: RN4.7 U2.J7 | length 1178.2
  Top Layer w3: U2.J7@980,1088.78 984.79,1083.99 ccw(c1011.43,1110.64) 1011.43,1072.95 1032.95,1072.95 v6(1035,1075) ; RN4.7@1097.83,679.84 1097.99,680 v6(1135,680)
  Int4 (Sign) w4: v6(1035,1075) 1105.71,1004.29 cw(c1035,933.58) 1134.13,946.7 cw(c1035,933.58) 1134.38,944.7 1134.39,944.48 ccw(c1138.39,944.7) 1138.39,940.7 1143.5,940.7 cw(c1143.5,937.2) 1143.5,933.7 1126.5,933.7 ccw(c1126.5,930.2) 1126.5,926.7 1143.5,926.7 cw(c1143.5,923.2) 1143.5,919.7 1126.5,919.7 ccw(c1126.5,916.2) 1126.5,912.7 1143.5,912.7 cw(c1143.5,909.2) 1143.5,905.7 1126.5,905.7 ccw(c1126.5,902.2) 1126.5,898.7 1143.5,898.7 cw(c1143.5,895.2) 1143.5,891.7 1126.5,891.7 ccw(c1126.5,888.2) 1126.5,884.7 1143.5,884.7 cw(c1143.5,881.2) 1143.5,877.7 1126.5,877.7 ccw(c1126.5,874.2) 1126.5,870.7 1143.5,870.7 cw(c1143.5,867.2) 1143.5,863.7 1126.5,863.7 ccw(c1126.5,860.2) 1126.5,856.7 1143.5,856.7 cw(c1143.5,853.2) 1143.5,849.7 1126.5,849.7 ccw(c1126.5,846.2) 1126.5,842.7 1143.5,842.7 cw(c1143.5,839.2) 1143.5,835.7 1126.5,835.7 ccw(c1126.5,832.2) 1126.5,828.7 1143.5,828.7 cw(c1143.5,825.2) 1143.5,821.7 1126.5,821.7 ccw(c1126.5,818.2) 1126.5,814.7 1143.5,814.7 cw(c1143.5,811.2) 1143.5,807.7 1126.5,807.7 ccw(c1126.5,804.2) 1126.5,800.7 1143.5,800.7 cw(c1143.5,797.2) 1143.5,793.7 1126.5,793.7 ccw(c1126.5,790.2) 1126.5,786.7 1143.5,786.7 cw(c1143.5,783.2) 1143.5,779.7 1126.5,779.7 ccw(c1126.5,776.2) 1126.5,772.7 1143.5,772.7 cw(c1143.5,769.2) 1143.5,765.7 1126.5,765.7 ccw(c1126.5,762.2) 1126.5,758.7 1143.5,758.7 cw(c1143.5,755.2) 1143.5,751.7 1126.5,751.7 ccw(c1126.5,748.2) 1126.5,744.7 1143.5,744.7 cw(c1143.5,741.2) 1143.5,737.7 1126.5,737.7 ccw(c1126.5,734.2) 1126.5,730.7 1143.5,730.7 cw(c1143.5,727.2) 1143.5,723.7 1139,723.7 ccw(c1139,719.7) 1135,719.7 1135,702.97 v6(1135,680)
DDR_RES_D0: RN5.5 U2.A8 | length 1406.8
  Top Layer w3: RN5.5@1097.83,322.52 1135.29,322.52 v2(1135.66,322.15)
  Top Layer w4: v2(944.99,1395.01) 945,1407.9 ; 945,1407.93 cw(c962.07,1407.93) 950,1420 cw(c962.07,1407.93) 962.07,1425 972.62,1425 cw(c972.62,1382.47) 1002.69,1412.54 U2.A8@1011.5,1403.74
  Int3 (Sign) w4: 932.67,1311.15 869.11,1247.6 ccw(c904.39,1212.31) 854.5,1212.31 854.5,1045.99 857.94,1042.55 857.94,892.63 857.94,892.56 ccw(c942.13,892.56) 882.49,833.13 902.81,812.81 915.12,800.5 1005.95,709.68 cw(c959.82,663.63) 1025,663.63 1025,546.21 ccw(c1076.21,546.21) 1040,510 1093.59,456.41 ccw(c1132,494.82) 1132,440.5 1147.08,440.5 cw(c1147.08,422.58) 1159.74,435.26 1163,432 1163,328 1157.15,322.15 v2(1135.66,322.15) ; 932.69,1311.17 ccw(c902.9,1340.92) 944.88,1337.69 ccw(c902.9,1340.92) 945,1340.92 945,1384.86 945,1394.8 v2(944.99,1395.01)
DDR_RES_D1: RN5.7 U2.B9 | length 1479.4
  Top Layer w3: RN5.7@1097.83,364.84 1124.84,364.84 v6(1125,365)
  Top Layer w4: v6(930,1360) 935.86,1365.86 ; 935.88,1365.88 cw(c970,1331.72) 970,1380 1005.26,1380 cw(c1005.26,1326.64) U2.B9@1042.99,1364.37
  Int4 (Sign) w4: 866.5,1088.5 866.5,1086.96 ccw(c966.5,1086.96) 866.5,1086.53 ccw(c966.5,1086.96) 895.79,1016.25 1083,829.04 cw(c1044.9,790.94) 1098.78,790.94 1098.78,428.3 ccw(c1188.3,428.3) v6(1125,365) ; 866.5,1088.53 ccw(c862.5,1088.53) 862.5,1092.53 858,1092.53 cw(c858,1096.03) 858,1099.53 875,1099.53 ccw(c875,1103.03) 875,1106.53 858,1106.53 cw(c858,1110.03) 858,1113.53 875,1113.53 ccw(c875,1117.03) 875,1120.53 858,1120.53 cw(c858,1124.03) 858,1127.53 875,1127.53 ccw(c875,1131.03) 875,1134.53 858,1134.53 cw(c858,1138.03) 858,1141.53 875,1141.53 ccw(c875,1145.03) 875,1148.53 858,1148.53 cw(c858,1152.03) 858,1155.53 873.32,1155.53 ccw(c873.32,1159.03) 873.32,1162.53 862.49,1162.53 cw(c862.49,1166.03) 862.49,1169.53 ccw(c862.5,1173.53) 866.5,1173.53 866.5,1184.53 866.5,1255.07 cw(c966.5,1255.07) 895.79,1325.79 v6(930,1360)
DDR_RES_D2: RN5.6 U2.B7 | length 1546.6
  Top Layer w3: v2(925,1325) ccw(c925,1362.73) 951.67,1336.04 ; 951.68,1336.05 U2.B7@980,1364.37 ; RN5.6@1097.83,345.16 1097.99,345 v2(1135,345)
  Int3 (Sign) w4: v2(925,1325) 864.07,1325 ccw(c864.07,1254.82) 814.45,1304.45 ccw(c921.75,1197.14) 770,1197.14 770,1196.45 770,1183.28 cw(c766,1183.28) 766,1179.28 761.91,1179.28 ccw(c761.91,1175.78) 761.91,1172.28 778.5,1172.28 cw(c778.5,1168.78) 778.5,1165.28 761.5,1165.28 ccw(c761.5,1161.78) 761.5,1158.28 778.5,1158.28 cw(c778.5,1154.78) 778.5,1151.28 761.5,1151.28 ccw(c761.5,1147.78) 761.5,1144.28 778.5,1144.28 cw(c778.5,1140.78) 778.5,1137.28 761.5,1137.28 ccw(c761.5,1133.78) 761.5,1130.28 778.5,1130.28 cw(c778.5,1126.78) 778.5,1123.28 761.5,1123.28 ccw(c761.5,1119.78) 761.5,1116.28 766,1116.28 cw(c766,1112.28) 770,1112.28 770,1110.28 770,922.07 ccw(c885.6,922.07) 803.86,840.33 935.8,708.39 cw(c887.75,660.35) 955.7,660.35 955.7,533.15 ccw(c999.07,533.15) 968.4,502.48 1012.94,457.94 ccw(c1079.5,510) 1019.72,450.28 ; 1019.75,450.25 1040.55,429.45 ; 1040.58,429.42 ccw(c1087.5,476.39) 1087.5,410 1100.86,410 cw(c1100.86,375.86) 1124.98,400.02 cw(c1100.86,375.86) 1135,375.86 v2(1135,345)
DDR_RES_D3: RN5.8 U2.C9 | length 1631.8
  Top Layer w3: U2.C9@1042.99,1325 1096.58,1325 cw(c1096.58,1266.2) 1138.13,1307.8 1150.31,1295.63 cw(c1122.63,1267.95) 1157.25,1286.21 cw(c1122.63,1267.95) 1161.77,1267.95 1161.77,1266.45 ccw(c1164.77,1266.45) 1164.77,1263.45 1170.77,1263.45 cw(c1170.77,1260.45) 1170.77,1257.45 1152.77,1257.45 ccw(c1152.77,1254.45) 1152.77,1251.45 1170.77,1251.45 cw(c1170.77,1248.45) 1170.77,1245.45 1152.77,1245.45 ccw(c1152.77,1242.45) 1152.77,1239.45 1170.77,1239.45 cw(c1170.77,1236.45) 1170.77,1233.45 1152.77,1233.45 ccw(c1152.77,1230.45) 1152.77,1227.45 1170.77,1227.45 cw(c1170.77,1224.45) 1170.77,1221.45 1152.77,1221.45 ccw(c1152.77,1218.45) 1152.77,1215.45 1170.77,1215.45 cw(c1170.77,1212.45) 1170.77,1209.45 1152.77,1209.45 ccw(c1152.77,1206.45) 1152.77,1203.45 1170.77,1203.45 cw(c1170.77,1200.45) 1170.77,1197.45 1152.77,1197.45 ccw(c1152.77,1194.45) 1152.77,1191.45 1170.77,1191.45 cw(c1170.77,1188.45) 1170.77,1185.45 1152.77,1185.45 ccw(c1152.77,1182.45) 1152.77,1179.45 1170.77,1179.45 cw(c1170.77,1176.45) 1170.77,1173.45 1152.77,1173.45 ccw(c1152.77,1170.45) 1152.77,1167.45 1170.77,1167.45 cw(c1170.77,1164.45) 1170.77,1161.45 1152.77,1161.45 ccw(c1152.77,1158.45) 1152.77,1155.45 1170.77,1155.45 cw(c1170.77,1152.45) 1170.77,1149.45 1152.77,1149.45 ccw(c1152.77,1146.45) 1152.77,1143.45 1170.77,1143.45 cw(c1170.77,1140.45) 1170.77,1137.45 1152.77,1137.45 ccw(c1152.77,1134.45) 1152.77,1131.45 1170.77,1131.45 cw(c1170.77,1128.45) 1170.77,1125.45 1152.77,1125.45 ccw(c1152.77,1122.45) 1152.77,1119.45 1170.77,1119.45 cw(c1170.77,1116.45) 1170.77,1113.45 1156.17,1113.45 ccw(c1156.17,1110.45) 1156.17,1107.45 1164.77,1107.45 cw(c1164.77,1104.45) 1164.77,1101.45 ccw(c1164.77,1098.45) 1161.77,1098.45 1161.77,1079.01 1161.77,423.72 cw(c1134.89,423.72) 1153.9,404.71 cw(c1127.06,422.93) 1150,400 cw(c1119.77,430.23) 1119.77,387.48 RN5.8@1097.83,387.48
DDR_RES_D4: RN6.5 U2.C7 | length 1448.5
  Top Layer w3: v2(905,1310) 923.76,1310 ccw(c923.76,1345) 942.59,1315.5 ccw(c923.76,1345) 948.5,1320.25 cw(c959.97,1308.78) 959.97,1325 U2.C7@980,1325 ; RN6.5@1095.67,427.68 1126.14,427.68 v2(1127.08,428.61)
  Int3 (Sign) w4: 850.86,1295.86 ccw(c901.28,1245.47) 830,1245.47 830,1163.19 830,1132.15 cw(c826,1132.15) 826,1128.15 825.78,1128.15 ccw(c825.78,1124.65) 825.78,1121.15 838.5,1121.15 cw(c838.5,1117.65) 838.5,1114.15 821.5,1114.15 ccw(c821.5,1110.65) 821.5,1107.15 838.5,1107.15 cw(c838.5,1103.65) 838.5,1100.15 821.5,1100.15 ccw(c821.5,1096.65) 821.5,1093.15 838.5,1093.15 cw(c838.5,1089.65) 838.5,1086.15 821.5,1086.15 ccw(c821.5,1082.65) 821.5,1079.15 838.5,1079.15 cw(c838.5,1075.65) 838.5,1072.15 821.5,1072.15 ccw(c821.5,1068.65) 821.5,1065.15 838.5,1065.15 cw(c838.5,1061.65) 838.5,1058.15 821.5,1058.15 ccw(c821.5,1054.65) 821.5,1051.15 838.5,1051.15 cw(c838.5,1047.65) 838.5,1044.15 821.5,1044.15 ccw(c821.5,1040.65) 821.5,1037.15 826,1037.15 cw(c826,1033.15) 830,1033.15 830,1031.15 830,870.87 ccw(c874.09,870.87) 842.91,839.69 948.88,733.72 1004.8,677.81 cw(c992.24,665.25) 1010,665.25 1010,657.89 1010,530 ccw(c1106.57,530) 1038.28,461.72 1051.7,448.3 ccw(c1099.23,495.83) 1099.23,428.61 v2(1127.08,428.61) ; 850.88,1295.88 cw(c885,1261.72) 885,1310 v2(905,1310)
DDR_RES_D5: RN6.6 U2.D9 | length 1354.2
  Top Layer w3: v2(970,1305) 981.4,1305 990.17,1313.78 1003.63,1313.78 1011.25,1306.16 1022.47,1306.16 U2.D9@1042.99,1285.63 ; RN6.6@1095.67,450.32 1145.31,450.32 v2(1150,455)
  Int3 (Sign) w4: 884.97,865.03 cw(c921.21,901.21) 870,901.21 870,1060.82 870,1153.78 870,1208.27 cw(c895.94,1208.27) 870.14,1211 cw(c895.94,1208.27) 877.6,1226.61 886.17,1235.18 cw(c934.01,1187.34) 913.05,1251.67 cw(c934.01,1187.34) 934.01,1255 940.94,1255 ccw(c940.94,1284.73) 961.96,1263.71 965.98,1267.73 ccw(c956.28,1277.43) 970,1277.43 v2(970,1305) ; 885,865 895,855.01 cw(c892.17,852.18) 895,849.35 ccw(c897.47,846.87) 894.99,844.4 ccw(c897.47,846.87) 899.94,844.4 907.32,851.77 cw(c909.79,849.3) 912.27,851.77 cw(c909.79,849.3) 912.27,846.82 901.71,836.27 ccw(c904.19,833.79) 901.71,831.32 ccw(c904.19,833.79) 906.66,831.32 918.68,843.34 cw(c921.16,840.86) 923.63,843.34 cw(c921.16,840.86) 923.63,838.39 911.61,826.37 ccw(c914.09,823.89) 911.61,821.42 ccw(c914.09,823.89) 916.56,821.42 928.58,833.44 cw(c931.06,830.96) 933.53,833.44 cw(c931.06,830.96) 933.53,828.49 921.51,816.47 ccw(c923.99,813.99) 921.51,811.52 ccw(c923.99,813.99) 926.46,811.52 938.48,823.54 cw(c940.96,821.06) 943.43,823.54 cw(c940.96,821.06) 943.43,818.59 931.41,806.57 ccw(c933.89,804.09) 931.41,801.62 ccw(c933.89,804.09) 936.36,801.62 939.54,804.8 cw(c942.37,801.97) 945.2,804.8 946.61,803.39 1025,725 cw(c988.79,688.79) 1040,688.79 1040,554.14 ccw(c1074.14,554.14) 1050,530 1120,460 ccw(c1132.07,472.07) 1132.07,455 v2(1150,455)
DDR_RES_D6: RN6.7 U2.D7 | length 1538.7
  Top Layer w3: RN6.7@1095.67,470 v2(1130,470)
  Top Layer w4: U2.D7@979.68,1285.31 979.68,1287.96 994.11,1302.38 v2(994.11,1304.28)
  Int3 (Sign) w4: v2(994.11,1304.28) 994.11,1343.48 cw(c1022.81,1343.48) 1002.52,1363.77 cw(c1010.93,1355.35) 1010.93,1367.26 1022.04,1367.26 1024.04,1367.26 ccw(c1024.04,1371.26) 1028.04,1371.26 1028.04,1375.76 cw(c1031.54,1375.76) 1035.04,1375.76 1035.04,1358.76 ccw(c1038.54,1358.76) 1042.04,1358.76 1042.04,1375.76 cw(c1045.54,1375.76) 1049.04,1375.76 1049.04,1358.76 ccw(c1052.54,1358.76) 1056.04,1358.76 1056.04,1375.76 cw(c1059.54,1375.76) 1063.04,1375.76 1063.04,1358.76 ccw(c1066.54,1358.76) 1070.04,1358.76 1070.04,1375.76 cw(c1073.54,1375.76) 1077.04,1375.76 1077.04,1358.76 ccw(c1080.54,1358.76) 1084.04,1358.76 1084.04,1375.76 cw(c1087.54,1375.76) 1091.04,1375.76 1091.04,1358.76 ccw(c1094.54,1358.76) 1098.04,1358.76 1098.04,1375.76 cw(c1101.54,1375.76) 1105.04,1375.76 1105.04,1358.76 ccw(c1108.54,1358.76) 1112.04,1358.76 1112.04,1375.76 cw(c1115.54,1375.76) 1119.04,1375.76 1119.04,1358.76 ccw(c1122.54,1358.76) 1126.04,1358.76 1126.04,1375.76 cw(c1129.54,1375.76) 1133.04,1375.76 1133.04,1361.23 ccw(c1136.54,1361.23) 1140.04,1361.23 1140.04,1363.47 cw(c1143.54,1363.47) 1147.04,1363.47 ccw(c1151.04,1363.47) 1149.62,1359.73 1159.77,1355.88 cw(c1129.76,1321.98) 1161.77,1354 1172.71,1343.06 cw(c1102,1272.35) 1202,1272.35 1202,560 cw(c1158.54,560) 1189.27,529.27 v2(1130,470)
DDR_RES_D7: RN6.8 U2.E9 | length 1429.5
  Top Layer w3: U2.E9@1042.99,1246.26 1043.62,1245.63 1064.37,1245.63 v2(1065,1245) ; RN6.8@1095.67,492.64 1110.29,492.64 ccw(c1110.29,510.38) 1122.83,497.83 v2(1125,500)
  Int3 (Sign) w4: v2(1065,1245) 1065,1235.18 1065,1223.76 ccw(c1069,1223.76) 1069,1219.76 1073.5,1219.76 cw(c1073.5,1216.26) 1073.5,1212.76 1056.5,1212.76 ccw(c1056.5,1209.26) 1056.5,1205.76 1073.5,1205.76 cw(c1073.5,1202.26) 1073.5,1198.76 1056.5,1198.76 ccw(c1056.5,1195.26) 1056.5,1191.76 1073.5,1191.76 cw(c1073.5,1188.26) 1073.5,1184.76 1056.5,1184.76 ccw(c1056.5,1181.26) 1056.5,1177.76 1062.49,1177.76 cw(c1062.49,1173.76) 1066.44,1174.36 1066.54,1173.76 ccw(c1098.18,1183.74) 1067.24,1171.76 ccw(c1098.18,1183.74) 1068.09,1169.77 1072.81,1163.01 cw(c1069.53,1160.72) 1072.36,1157.89 1068.72,1154.25 ccw(c1071.2,1151.78) 1068.72,1149.31 ccw(c1071.2,1151.78) 1073.67,1149.3 1085.69,1161.33 cw(c1088.17,1158.85) 1090.64,1161.33 cw(c1088.17,1158.85) 1090.64,1156.38 1078.62,1144.36 ccw(c1081.1,1141.88) 1078.62,1139.41 ccw(c1081.1,1141.88) 1083.57,1139.41 1095.59,1151.43 cw(c1098.07,1148.95) 1100.54,1151.43 cw(c1098.07,1148.95) 1100.54,1146.48 1088.52,1134.46 ccw(c1091,1131.98) 1088.52,1129.51 ccw(c1091,1131.98) 1093.47,1129.51 1105.49,1141.53 cw(c1107.97,1139.05) 1110.44,1141.53 cw(c1107.97,1139.05) 1110.44,1136.58 1098.42,1124.56 ccw(c1100.9,1122.08) 1098.42,1119.61 ccw(c1100.9,1122.08) 1103.37,1119.61 1115.39,1131.63 cw(c1117.87,1129.15) 1120.34,1131.63 cw(c1117.87,1129.15) 1120.34,1126.68 1108.32,1114.66 ccw(c1110.8,1112.18) 1108.32,1109.71 ccw(c1110.8,1112.18) 1113.27,1109.71 1125.29,1121.73 cw(c1127.77,1119.25) 1130.24,1121.73 cw(c1127.77,1119.25) 1130.24,1116.78 1118.22,1104.76 ccw(c1120.7,1102.28) 1118.22,1099.81 ccw(c1120.7,1102.28) 1123.17,1099.81 1135.19,1111.83 cw(c1137.67,1109.35) 1140.14,1111.83 cw(c1137.67,1109.35) 1140.14,1106.88 1128.12,1094.86 ccw(c1130.6,1092.38) 1128.12,1089.91 ccw(c1130.6,1092.38) 1133.07,1089.91 1145.09,1101.93 cw(c1147.57,1099.45) 1150.04,1101.93 cw(c1147.57,1099.45) 1150.04,1096.98 1138.02,1084.96 ccw(c1140.5,1082.48) 1138.02,1080.01 ccw(c1140.5,1082.48) 1142.97,1080.01 1154.99,1092.03 cw(c1157.47,1089.55) 1159.94,1092.03 cw(c1157.47,1089.55) 1159.94,1087.08 1147.92,1075.06 ccw(c1150.39,1072.58) 1147.92,1070.11 ccw(c1150.4,1072.58) 1152.87,1070.11 1164.89,1082.13 cw(c1167.37,1079.66) 1169.84,1082.13 cw(c1167.37,1079.66) 1169.84,1077.18 1157.82,1065.16 ccw(c1160.29,1062.68) 1157.82,1060.21 ccw(c1160.29,1062.68) 1162.77,1060.21 1174.79,1072.23 cw(c1177.27,1069.76) 1179.74,1072.23 cw(c1177.27,1069.76) 1179.74,1067.28 1167.72,1055.26 ccw(c1170.19,1052.78) 1167.72,1050.31 ccw(c1170.19,1052.78) 1172.67,1050.31 1175.69,1053.34 cw(c1178.52,1050.51) 1181.79,1052.81 1182.56,1051.72 cw(c1167.93,1042.93) 1183.53,1049.86 cw(c1167.93,1042.93) 1185,1042.93 1185,595.36 cw(c1099.64,595.36) 1160.04,535.04 cw(c1099.64,595.36) 1160,535 v2(1125,500)
DDR_RES_D8: RN8.5 U2.E1 | length 126.5
  Top Layer w3: RN8.5@665,1247.36 666.1,1246.26 U2.E1@791.02,1246.26
DDR_RES_D9: RN8.6 U2.D3 | length 193.2
  Top Layer w3: RN8.6@665,1270 816.28,1270 ccw(c816.28,1323.36) U2.D3@854.02,1285.63
DDR_RES_D10: RN8.7 U2.D1 | length 127.7
  Top Layer w3: RN8.7@665,1289.68 666.9,1287.79 788.87,1287.79 U2.D1@791.02,1285.63
DDR_RES_D11: RN8.8 U2.C3 | length 193.3
  Top Layer w3: RN8.8@665,1312.32 665.82,1311.5 825,1311.5 ccw(c825,1348.96) 851.49,1322.47 U2.C3@854.02,1325
DDR_RES_D12: RN10.5 U2.C1 | length 183.5
  Top Layer w4: RN10.5@722.83,1467.52 722.83,1386.44 ccw(c781.44,1386.44) 740,1345 ccw(c788.28,1393.28) 788.28,1325 U2.C1@791.02,1325
DDR_RES_D13: RN10.6 U2.B3 | length 258.2
  Top Layer w4: RN10.6@722.83,1490.16 722.91,1490.24 741.13,1490.24 cw(c741.13,1472.63) 753.59,1485.08 cw(c741.51,1473.01) 758.59,1473.01 758.59,1391.29 ccw(c823.94,1391.29) 769.25,1355.51 ccw(c794.44,1380.7) 794.44,1345.08 810.66,1345.08 ccw(c810.66,1403.18) 851.76,1362.12 U2.B3@854.02,1364.37
DDR_RES_D14: RN10.7 U2.B1 | length 183.7
  Top Layer w4: RN10.7@722.83,1509.84 736.24,1509.84 cw(c736.24,1476.24) 760,1500 cw(c723.79,1463.79) 775,1463.79 775,1403.05 ccw(c829.71,1403.05) U2.B1@791.02,1364.37
DDR_RES_D15: RN10.8 U2.A2 | length 213.8
  Top Layer w4: RN10.8@722.83,1532.48 788.38,1532.48 cw(c788.38,1498.34) 812.5,1522.5 cw(c788.38,1498.34) 822.52,1498.34 U2.A2@822.52,1403.74
DDR_RES_D\C\A\S\: RN7.6 U2.G8 | length 827.2
  Top Layer w3: v2(940,1195) 955.81,1195 cw(c955.81,1156.84) 982.79,1183.82 990.32,1176.29 ccw(c1011.5,1197.47) 1003.47,1168.62 ccw(c1011.5,1197.47) U2.G8@1011.5,1167.52 ; RN7.6@1097.83,555.16 1101.45,558.78 1118.78,558.78 v2(1120,560)
  Int3 (Sign) w4: v2(940,1195) 940,1189.43 cw(c926.56,1189.43) 936.07,1179.94 930.79,1174.65 ccw(c953.03,1152.41) 921.58,1152.41 921.58,917.41 ccw(c967.41,917.41) 935,885 1060,760 cw(c1023.79,723.79) 1075,723.79 1075,617.43 ccw(c1141.21,617.43) 1094.38,570.62 ccw(c1120,596.21) v2(1120,560)
DDR_RES_D\C\L\K\E\: RN9.6 U2.H3 | length 203.8
  Top Layer w3: RN9.6@660.67,1160.32 794.69,1160.32 cw(c794.69,1124.69) 819.87,1149.89 ; 819.88,1149.88 832.84,1136.92 ccw(c854.02,1158.1) 845.99,1129.25 ccw(c854.02,1158.1) U2.H3@854.02,1128.15
DDR_RES_D\C\S\0\: RN4.5 U2.H8 | length 689.9
  Top Layer w3: v2(960,1150) 974.82,1150 cw(c974.82,1114.21) 1000.13,1139.52 U2.H8@1011.5,1128.15 ; RN4.5@1097.83,637.52 1098.26,637.1 v2(1135,637.1)
  Int3 (Sign) w4: v2(960,1150) 960,952.04 1105.52,806.51 1105.52,662.88 ccw(c1137.88,662.88) 1115,640 ccw(c1122.01,647.01) 1122.01,637.1 v2(1135,637.1)